# Altium PCB CH582M_USB_DONGLE.PcbDoc
Units mil, origin at the board's own origin, x right, y up, seen from the top; angles counter-clockwise.
Board outline 634.98 x 440 mil, 2 copper layers (Top Layer, Bottom Layer); 15 components, 17 nets, 80 pads, 15 vias.
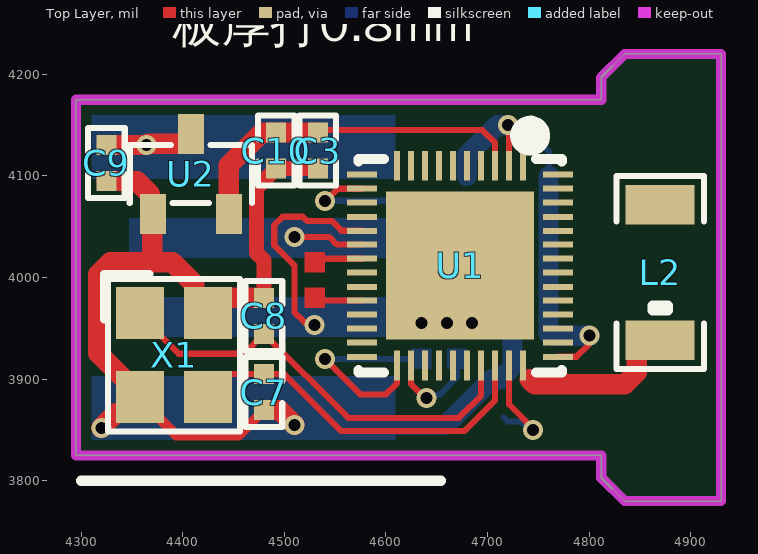
[diagram p0: Top Layer view]
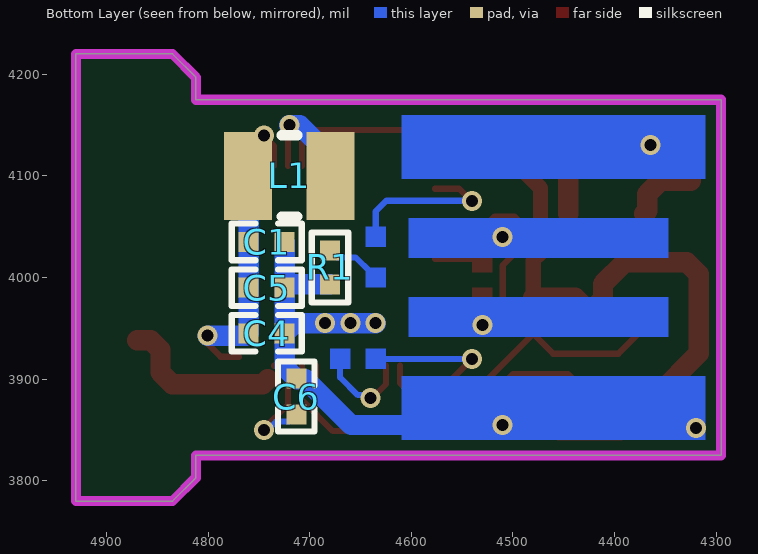
[diagram p1: Bottom Layer view, seen from below]
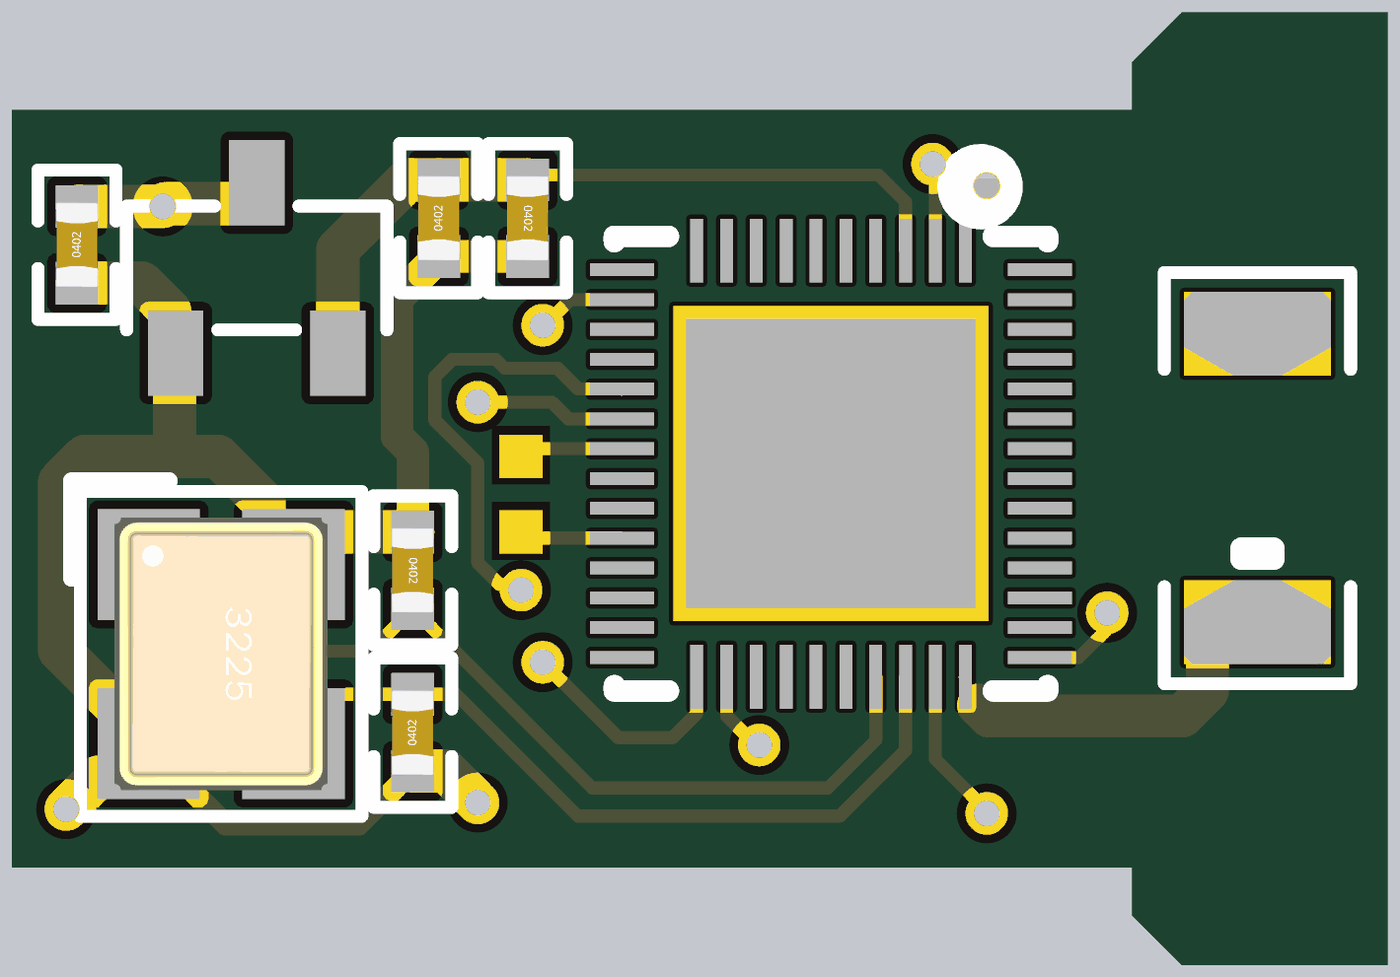
[diagram p2: 3D render of the assembled board from above, using the file's embedded part models]
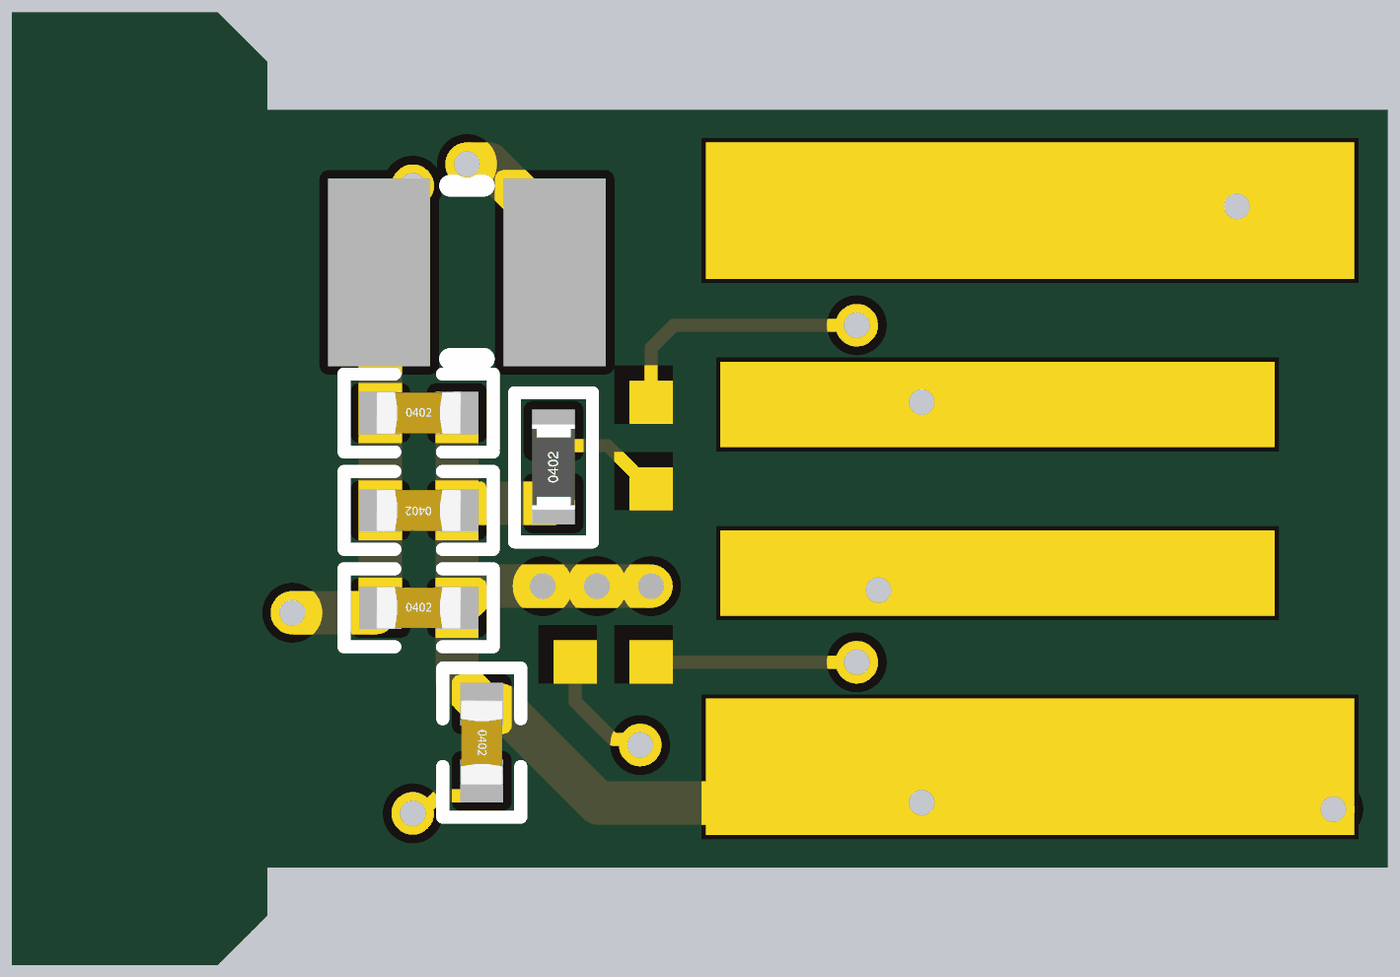
[diagram p3: 3D render of the assembled board from below, using the file's embedded part models]

## Layer stack, top to bottom
Top Solder: solder mask 0.4, Solder Resist, Dk 3.5
Top Layer: signal copper 1.4
Dielectric 1: dielectric 12.6, FR-4, Dk 4.8
Bottom Layer: signal copper 1.4
Bottom Solder: solder mask 0.4, Solder Resist, Dk 3.5

## Board outline
4295.02,3824.98 4295.02,4175.02 4812.02,4175.02 4812.02,4197.02 4835,4220 4930,4220 4930,3780 4835,3780 4812.02,3802.98 4812.02,3824.98

## Design rules (kind name [scope] priority, off if disabled: settings)
Clearance [All] p1: gap=7 ignorepadtopadclearanceinfootprint=TRUE
PolygonConnect [All] p1: connectstyle=Relief reliefconductorwidth=10 reliefentries=4 polygonreliefangle="90 Angle" airgapwidth=10
RoutingVias [All] p1: holewidth=11.81 width=19.68 viastyle="Through Hole" minholewidth=11.81 minwidth=19.68 maxholewidth=11.81 maxwidth=19.68
SolderMaskExpansion [All] p1: expansion=4 istentingtop=FALSE
Width [All] p1: maxlimit=100 minlimit=6 preferedwidth=10 minimp=50.000000 maximp=50.000000 favimp=50.000000
30 further rules are at their usual default settings.

## Components (designator, comment, footprint, x,y, rotation, side; value= is the part's Value field where it differs from the comment)
C1 "2.2uF 10% 6.3V" C0402_L 4742.28,4035 r180 bottom
C3 "100nF 10% 50V" C0402_L 4533,4125 r270 top
C4 "100nF 10% 50V" C0402_L 4742.28,3945 r180 bottom
C5 "2.2uF 10% 6.3V" C0402_L 4742.28,3990 r0 bottom
C6 "2.2uF 10% 6.3V" C0402_L 4713.15,3882.72 r270 bottom
C7 "18pF 5% 50V" C0402_L 4480,3887.28 r90 top
C8 "18pF 5% 50V" C0402_L 4480,3962.28 r270 top
C9 "10uF 10% 6.3V" C0402_L 4325,4112.72 r90 top
C10 "10uF 10% 6.3V" C0402_L 4492,4125 r90 top
L1 "ftc252012s100mbca" IND-SMD_L2.5-W2.0 4720,4100 r180 bottom value=10uH
L2 "rfeca3216060a1t" ANT-SMD_L3.1-W1.6 4870,4005 r90 top
R1 "10k 5%" R0402_L 4680,4010 r90 bottom
U1 "ch582m" QFN-48_L5.0-W5.0-P0.35-BL-EP 4673.1,4011.6 r180 top locked
U2 "662k." SOT-23-3_L2.9-W1.3-P1.90-LS2.4-BR 4408,4102 r270 top
X1 "32MHz/10ppm" OSC-3225-4P 4391.54,3923.66 r270 top

## Footprints (in the part's own frame and the unit in brackets; to place one, negate y for a bottom-side part, rotate by r counter-clockwise, add the part's x,y. Pads: shape width x height; smd on the part's side, far side on the other; paste and mask are expansions set on the pad)
ANT-SMD_L3.1-W1.6 [mil]
  rect 38.7x68 smd paste-3937 mask+2: 1(-66.6,0) 2(66.6,0)
  silkscreen extent -95,-43 95,43
C0402_L [mm] "贴片MLCC电容"
  rect 0.5x0.5 smd: 1(-0.45,0) 2(0.45,0)
  silkscreen extent -0.87,-0.46 0.88,0.46, body extent -0.5,-0.25 0.5,0.25, height 0.5
IND-SMD_L2.5-W2.0 [mil]
  rect 47.2x86.6 smd: 1(40.5,0) 2(-40.5,0)
  silkscreen extent -8,-40 8,40
OSC-3225-4P [mm] "3.2*2.5*0.7mm(长宽高)                             淘宝ID:黄晶宝石"
  rect 1.3x1.2 smd: 1(-1.05,-0.85) 2(1.05,-0.85) 3(1.05,0.85) 4(-1.05,0.85)
  silkscreen extent -2.03,-1.75 1.91,1.65, body extent -1.6,-1.25 1.6,1.25, height 0.7
QFN-48_L5.0-W5.0-P0.35-BL-EP [mil]
  rect 5.9x29.5 smd paste-3937 mask+2: 1(-62,-98.4) 2(-48.2,-98.4) 3(-34.4,-98.4) 4(-20.7,-98.4) 5(-6.9,-98.4) 6(6.9,-98.4) 7(20.7,-98.4) 8(34.5,-98.4) 9(48.2,-98.4) 10(62,-98.4) 25(62,98.4) 26(48.2,98.4) 27(34.5,98.4) 28(20.7,98.4) 29(6.9,98.4) 30(-6.9,98.4) 31(-20.7,98.4) 32(-34.4,98.4) 33(-48.2,98.4) 34(-62,98.4)
  rect 29.5x5.9 smd paste-3937 mask+2: 11(96.5,-89.6) 12(96.5,-75.8) 13(96.5,-62) 14(96.5,-48.2) 15(96.5,-34.4) 16(96.5,-20.7) 17(96.5,-6.9) 18(96.5,6.9) 19(96.5,20.7) 20(96.5,34.4) 21(96.5,48.2) 22(96.5,62) 23(96.5,75.8) 24(96.5,89.6) 35(-96.4,89.6) 36(-96.4,75.8) 37(-96.4,62) 38(-96.4,48.2) 39(-96.4,34.4) 40(-96.4,20.7) 41(-96.4,6.9) 42(-96.4,-6.9) 43(-96.4,-20.7) 44(-96.4,-34.4) 45(-96.4,-48.2) 46(-96.4,-62) 47(-96.4,-75.8) 48(-96.4,-89.6)
  rect 145.7x145.7 smd paste-3937 mask+2: 49(0,0)
  silkscreen extent -100,-138 100,105
R0402_L [mm] "1/16W贴片电阻"
  rect 0.5x0.5 smd: 1(-0.425,0) 2(0.425,0)
  silkscreen extent -0.88,-0.46 0.87,0.46, body extent -0.5,-0.25 0.5,0.25, height 0.3
SOT-23-3_L2.9-W1.3-P1.90-LS2.4-BR [mm]
  rect 1x0.65 smd: 1(1,-0.95) 2(1,0.95) 3(-1,0)
  silkscreen extent -0.73,-1.53 0.73,1.53

## Part data
C1 C3 C4 C5 C6 C7 C8 C9 C10: library part C, "贴片电容", BOM名称=无极性贴片电容, 优秀评价可免费更新=联系淘宝ID：黄晶宝石，获取更新版封装库, 卖家免费技术支持，联系售后=唯一出售店铺网址https://shop463601444.taobao.com, 本封装库来自淘宝卖家 ID：黄晶宝石=其他店铺购入均为盗版，请立即申请退款
L1: "电感值:10uH;精度:±20%;额定电流:1.2A;饱和电流(Isat):1.6A;类型:一体成型电感;", DC Resistance (DCR)=330mΩ, JLCPCB Part Class="Extended Part", LCSC Part Name="10uH ±20% 1.6A", Manufacturer=cjiang(长江微电), ManufacturerPart=FTC252012S100MBCA, Rated Current=1.2A, Saturation Current (Isat)=1.6A, Tolerance=±20%, AddInBom=yes, ConvertToPcb=yes, DataSheet=https://atta.szlcsc.com/upload/public/pdf/source/20230602/8FFEDA9C0247A92A0D4B67554BFE4091.pdf, FootprintName=IND-SMD_L2.5-W2.0, ModelId=85d117b4abb34d9087271edcd9ba0330, ModelName=IND-SMD_L2.5-W2.0-H1.2, ModelTransform=99.2124,78.74,0,0,0,0,0,0,0, Supplier=LCSC, Supplier Footprint=SMD,2x2.5mm, SupplierPart=C5832376, Symbol=FTC252012S100MBCA, Type=一体成型电感
L2: "天线类型:陶瓷天线;中心频点:2.4GHz;带宽:-;峰值增益:2dBi;极化方式:-;功率容量:-;驻波比:2.1;", Central Frequency=2.4GHz, JLCPCB Part Class="Extended Part", LCSC Part Name="2.4 GHz ISM频段工作频率的陶瓷天线", Manufacturer=Walsin(华新科), ManufacturerPart=RFECA3216060A1T, operating temperature=-, AddInBom=yes, Antenna Type=陶瓷天线, Bandwidth=-, ConvertToPcb=yes, DataSheet=https://atta.szlcsc.com/upload/public/pdf/source/20180326/C127620_3C564CCA307EE04222EAFCE04B7FD99A.pdf, FootprintName=ANT-SMD_L3.1-W1.6, Impedance=-, ModelId=fe75f6c932bd483aac67fd9557788572, ModelName=ANT-SMD_L3.1-W1.6-H0.6, ModelTransform=122.047,62.992,0,0,0,0,-0.0005,0,0, Peak Gain=2dBi, Polarization Type=-, Power capacity=-, Supplier=LCSC, Supplier Footprint=1206, SupplierPart=C127620, Symbol=RFECA3216060A1T, VSWR=2.1
R1: library part R, "贴片电阻", BOM名称=贴片电阻, 优秀评价可免费更新=联系淘宝ID：黄晶宝石，获取更新版封装库, 卖家免费技术支持，联系售后=唯一出售店铺网址https://shop463601444.taobao.com, 本封装库来自淘宝卖家 ID：黄晶宝石=其他店铺购入均为盗版，请立即申请退款
U1: "CPU内核:RISC-V;程序存储容量:512KB;RAM总容量:32KB;GPIO端口数量:40;工作电压范围:2.3V~3.6V;CPU最大主频:80MHz;程序存储器类型:FLASH;", JLCPCB Part Class="Extended Part", LCSC Part Name=CH582M, Low-Voltage Detect=-, Manufacturer=WCH(南京沁恒), Operating Temperature Range=-40℃~+85℃, Operating Voltage Range=2.3V~3.6V, 8Bit Timer=-, 16Bit Timer=-, 32Bit Timer=4, ADC (Bit)=12bit, AddInBom=yes, CAN=-, CCP Capture/Compare=-, communication protocol=-, ConvertToPcb=yes, CPU Core=RISC-V, CPU Maximum Speed=80MHz, DAC (Bit)=-, DataSheet=https://atta.szlcsc.com/upload/public/pdf/source/20220111/7785F6388C97C318998CCEA67CDD9164.pdf, Direct Memory Access=-, FootprintName=QFN-48_L5.0-W5.0-P0.35-BL-EP, GPIO Ports Number=40, I2C=1, I2S=-, Infrared Data Association=-, Internal Comparator=-, Internal Oscillator=-, ManufacturerPart=CH582M, ModelId=4b8d4b49de7e447b9d591de0c72709ce, ModelName=QFN-48_L5.0-W5.0-P0.35-BL-EP, ModelTransform=197.6374,197.6374,0,270,0,0,0,0,0, Peripheral/Function=-, Program Memory Type=FLASH, Program Storage Size=512KB, PWM (Bit)=26bit, RAM Size=32KB, Real-Time Clock=-, Secure Digital Input and Output=-, SPI=2, Supplier=LCSC, Supplier Footprint=QFN-48-EP(5x5), SupplierPart=C2920766, Symbol=CH582M, UART/USART=4, Universal Serial Bus=-, Watchdog=-
U2: "输出极性:正极;工作电压:6V;输出电压:3.3V;输出电流:300mA;电源纹波抑制比(PSRR):-;输出类型:固定;", JLCPCB Part Class="Extended Part", LCSC Part Name="3.3V 300mA 6V", Manufacturer=FM(富满), ManufacturerPart=662K., operating temperature=-40℃~+130℃@(Tj), Output Current=300mA, Output Voltage=3.3V, Power Supply Rejection Ratio (PSRR)=-, standby current=10uA, Voltage - Supply=6V, Voltage Dropout=40mV@(30mA), AddInBom=yes, ConvertToPcb=yes, DataSheet=https://item.szlcsc.com/datasheet/662K./898173.html, Features=短路保护, FootprintName=SOT-23-3_L2.9-W1.3-P1.90-LS2.4-BR, ModelId=c62791f0466c4ae2a892c056b845b0ca, ModelName=SOT-23-3P_L2.9-W1.3-H1.0-LS2.4-P0.95, ModelTransform=98.425,114.173,0,180,0,0,0.0005,-0.0005,0, Noise=-, Number of Outputs=1, Output Configuration=正极, Output Type=固定, Supplier=LCSC, Supplier Footprint=SOT-23-3, SupplierPart=C841298, Symbol=662K.
X1: library part OSC44M_5, "晶振"

## Via types
v1: diameter 19.68, hole 11.81, Top Layer to Bottom Layer, 15 vias

## Nets (pads, with @x,y where several pads share a name; then routed paths per layer and width w, separated by ;. In a path a pad name is that pad's centre, name@x,y a point inside that pad or via, vN(x,y) a via of type N, cw(c..) or ccw(c..) an arc to the next point about the centre after c; other vN are vias at no path point)
3V3: C3.1 C10.2 U1.3 U2.2 | length 351.9
  Top Layer w6: C3.1 4535.28,4145 4695,4145 4707.45,4132.55 4707.45,4110.05 U1.3
  Top Layer w20: U2.2 4445.4,4110.4 4477.72,4142.72 C10.2 C3.1
ANT: L2.1 U1.34 | length 161.9
  Top Layer w6: U1.34@4735.05,3913.15 U1.34
  Top Layer w20: 4741.3,3900 4746.3,3895 4835.13,3895 4846.85,3906.72 4846.85,3929.05 4856.2,3938.4 L2.1
BOOT: U1.26 | length 100.5
  Top Layer w6: U1.26 4624.9,3895.06 4638.35,3881.61 v1(4640,3881.61)
  Bottom Layer w6: v1(4640,3881.61) 4642.62,3884.23 4652.62,3884.23 4670,3901.61 4670,3925
DEBUG_RX: U1.20 | length 52.8
  Top Layer w6: 4530,3985 4530,3980 4532.8,3977.2 U1.20
DEBUG_TX: U1.17 | length 45.1
  Top Layer w6: 4531.5,4018.5 U1.17
GND: C1.2 C3.2 C4.2 C5.1 C6.1 C7.1 C8.1 C9.1 C10.1 R1.1 U1.49 U2.1 X1.2 X1.4 | length 1374.2
  Top Layer w10: X1.2@4358.07,3880.35 4393.69,3844.73 4455.17,3844.73 C7.1
  Top Layer w15: C8.1 4480,4016.98 4472.7,4024.29 4472.7,4087.98 C10.1 C3.2
  Top Layer w20: v1(4320,3851.97) 4334.76,3866.73 4344.45,3866.73 4358.07,3880.35 4358.07,3884.29 4317.02,3925.34 4317.02,4003.28 4328.73,4015 4370,4015 ; C9.1 4355,4095 4367.8,4082.2 4367.8,4065.43 U2.1 4370,4062.03 4370,4015 ; C7.1 4495.43,3869.57 v1(4510,3855) ; C8.1 4438.62,3980 4425,3966.38 X1.4 4411.38,3978.62 4411.38,3993.62 4390,4015 4370,4015
  Bottom Layer w20: v1(4510,3855) 4510.23,3854.76 4659.19,3854.76 4704.42,3900 4712.71,3900 4724.57,3911.85 C4.2 ; v1(4635,3955) 4714.57,3955 C4.2 ; R1.1 4721.3,3993.27 C5.1 ; C1.2 C5.1 ; C4.2 C5.1
  other v1: 4660,3955 4685,3955
LED: U1.12 | length 167.9
  Top Layer w6: v1(4540,4075.55) 4541,4075.55 4552.85,4087.4 U1.12
  Bottom Layer w6: v1(4540,4075.55) 4624.45,4075.55 4635,4065 4635,4045 4640,4040
NetC6_2: C6.2 U1.33 | length 107.2
  Top Layer w6: U1.33 4721.3,3875 4745,3851.3 v1(4745,3850)
  Bottom Layer w6: C6.2@4715.86,3862.28 4719.99,3858.16 4733.14,3858.16 4741.3,3850 v1(4745,3850)
NetL1_1: L1.1 U1.2 | length 113.3
  Top Layer w6: v1(4720,4150) 4721.3,4148.7 U1.2
  Bottom Layer w20: L1.1 4679.5,4119.7 4709.8,4150 v1(4720,4150)
NetLED1_2: R1.2 | length 54
  Bottom Layer w6: 4640,4000 4640,4005 4654.89,4019.89 4673.16,4019.89 R1.2
RST: U1.25 | length 204.4
  Top Layer w6: v1(4540,3919.84) 4574.84,3885 4600,3885 4611.1,3896.1 U1.25
  Bottom Layer w6: v1(4540,3919.84) 4629.84,3919.84 4635,3925
USB_D_N: U1.16 | length 69.8
  Top Layer w6: v1(4510.04,4040) 4544.14,4040 4551.84,4032.3 U1.16
USB_D_P: U1.15 | length 214.8
  Top Layer w6: v1(4530,3953.16) 4527.38,3955.78 4520.08,3955.78 4510,3965.86 4510,4011.94 4490.2,4031.74 4490.2,4051.68 4498.36,4059.84 4518.22,4059.84 4522.36,4055.7 4546.82,4055.7 4556.48,4046.05 U1.15 U1.15
VDCID: C1.1 C4.1 C5.2 L1.2 U1.1 U1.35 | length 321.5
  Top Layer w6: U1.1 4735.1,4129.64 4745,4139.54 v1(4745,4140) ; U1.35 4769.55,3922.05 4787.59,3922.05 4800,3934.46 4800,3942.08 v1(4800.62,3942.7)
  Bottom Layer w6: v1(4745,4140) 4760.5,4124.5 L1.2
  Bottom Layer w20: L1.2 4760,4099.5 C1.1 C5.2 C4.1 4762.3,3942.7 v1(4800.62,3942.7)
Vusb: C9.2 U2.3 | length 84.6
  Top Layer w20: C9.2 v1(4364.57,4130.43) 4365.82,4131.69 4405.31,4131.69 U2.3@4408,4134.37
X32MI: C7.2 U1.32 X1.3 | length 363.2
  Top Layer w6: X1.3@4423.46,3882.76 4445.62,3904.91 4449.05,3904.91 4449.14,3905 C7.2 4500,3905 4556.23,3848.76 4677.15,3848.76 4707.5,3879.12 U1.32
X32MO: C8.2 U1.31 X1.1 | length 422.9
  Top Layer w6: X1.1@4364.76,3956.34 4396.1,3925 4460.43,3925 C8.2 4562.8,3861.76 4671.77,3861.76 4693.8,3883.8 U1.31
pads on no net: L2.2 U1.4 U1.5 U1.6 U1.7 U1.8 U1.9 U1.10 U1.11 U1.13 U1.14 U1.18 U1.19 U1.21 U1.22 U1.23 U1.24 U1.27 U1.28 U1.29 U1.30 U1.36 U1.37 U1.38 U1.39 U1.40 U1.41 U1.42 U1.43 U1.44 U1.45 U1.46 U1.47 U1.48

## Keep-outs
Keep-Out Layer:
  the board outline again, w10

## Other copper
Top Layer:
  rectangle net DEBUG_RX: 4520,3970 4540,3990
  rectangle net DEBUG_TX: 4520,4005 4540,4025
Bottom Layer:
  rectangle net RST: 4625,3910 4645,3930
  rectangle net BOOT: 4660,3910 4680,3930
  rectangle net NetLED1_2: 4625,3990 4645,4010
  rectangle net LED: 4625,4030 4645,4050
  rectangle net Vusb: 4310.39,4097 4609.61,4160
  rectangle net USB_D_P: 4347.05,3941.3 4602.95,3980.7
  rectangle net USB_D_N: 4347.05,4019.3 4602.95,4058.7
  rectangle net GND: 4310.39,3840 4609.61,3903

## Silkscreen, mask and mechanical layers (free items; w line width, h text height)
Top Overlay:
  lines w10: 4300,3800 4654.33,3800
  text "板厚打0.8mm" at 4390.04,4220.66 h60
Top Solder:
  rectangle: 4516.5,3967 4543.5,3994
  rectangle: 4516.5,4002 4543.5,4029
Bottom Solder:
  rectangle: 4308.39,4095 4611.61,4162
  rectangle: 4345.05,4017.3 4604.95,4060.7
  rectangle: 4625,4030 4652,4057
  rectangle: 4625,3990 4652,4017
  rectangle: 4625,3910 4652,3937
  rectangle: 4660,3910 4687,3937
  rectangle: 4345.05,3939.3 4604.95,3982.7
  rectangle: 4308.39,3838 4611.61,3905